# Altium PCB BOARD_4LAYER.PcbDoc (part 9 of 21)
Units mil, origin at the board's own origin, x right, y up, seen from the top; angles counter-clockwise.
Board outline 6692.91 x 10039.37 mil, 4 copper layers (Top Layer, Mid Layer 1, Mid Layer 2, Bottom Layer), stack 66.299 mil thick; 1532 components, 908 nets, 4105 pads, 1286 vias.
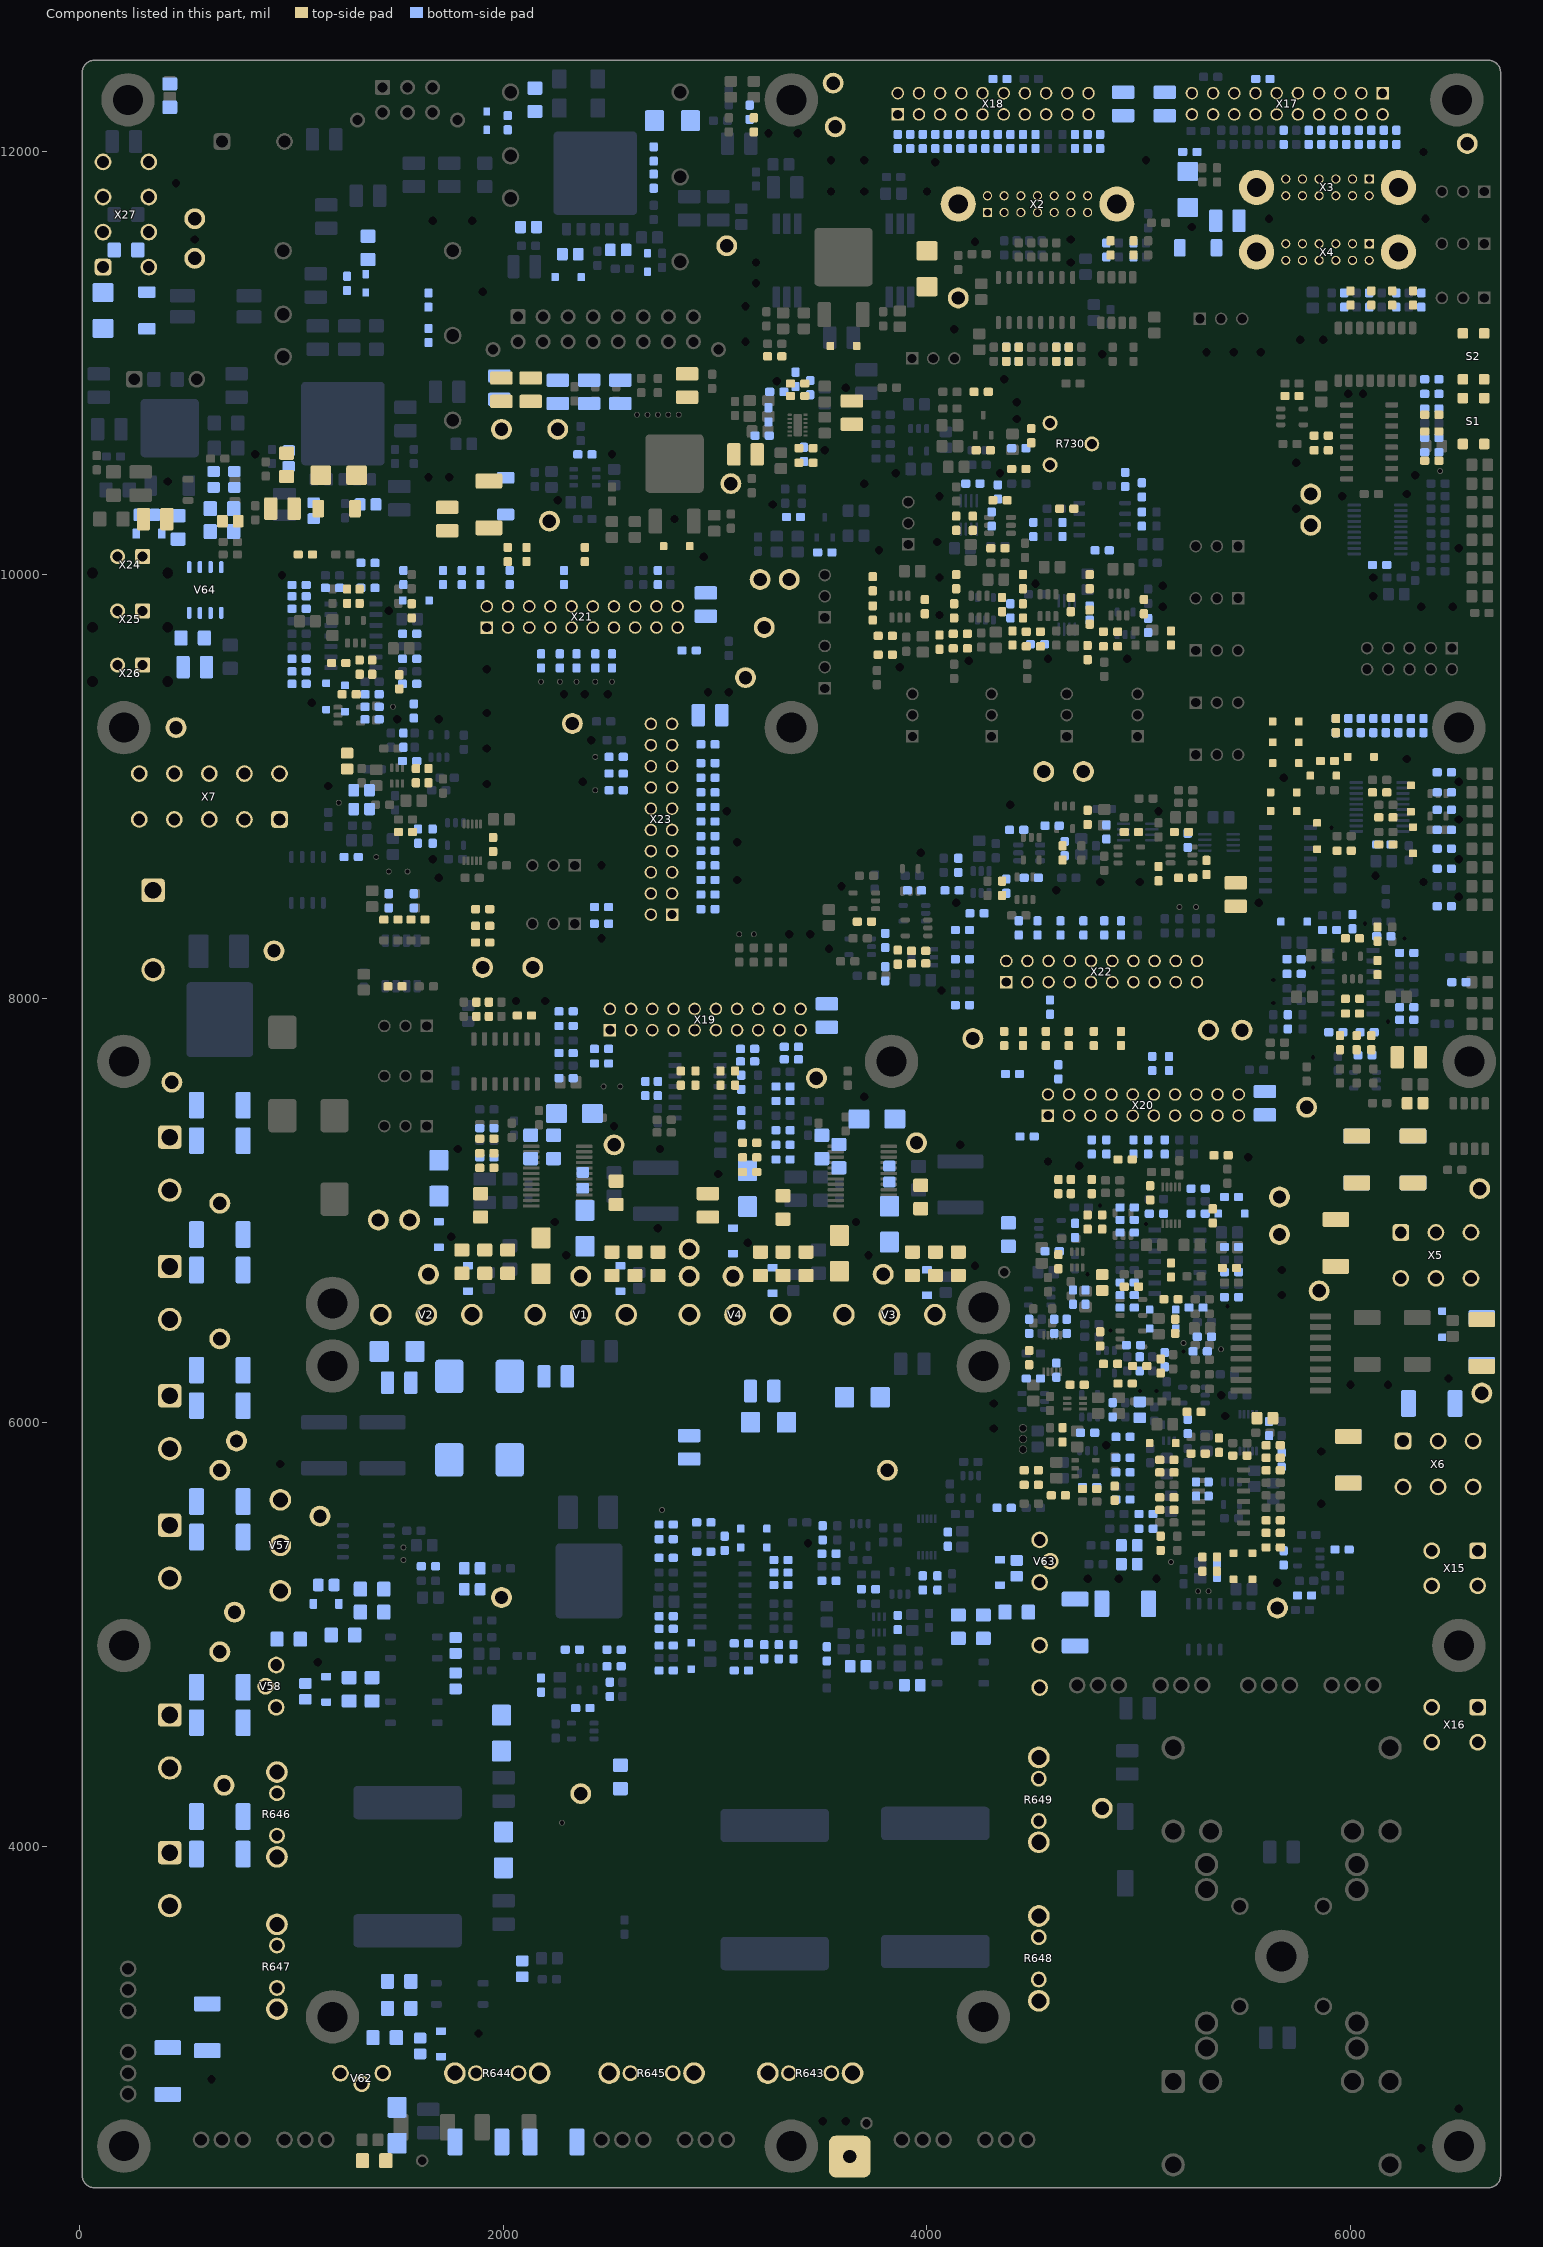
[diagram p11: the components of this part, seen from the top]

## Components (designator, comment, footprint, x,y, rotation, side; value= is the part's Value field where it differs from the comment) (continued)
R156 "ERJ-3EKF6200V" 0603-STANDART-1608 6440.94,8797.24 r0 bottom
R157 "ERJ-3EKF6200V" 0603-STANDART-1608 6440.94,8437.01 r0 bottom
R158 "ERJ-3EKF6200V" 0603-STANDART-1608 6440.94,8708.66 r0 bottom
R159 "ERJ-3EKF6200V" 0603-STANDART-1608 6440.94,8614.17 r0 bottom
R160 "ERJ-3EKF6200V" 0603-STANDART-1608 6440.94,8891.73 r0 bottom
R161 "ERJ-3EKF6200V" 0603-STANDART-1608 6440.94,8974.41 r0 bottom
R162 "ERJ-3EKF6200V" 0603-STANDART-1608 6440.94,9068.9 r0 bottom
R163 "ERJ-3EKF6200V" 0603-STANDART-1608 5988.19,9289.37 r90 bottom
R164 "ERJ-3EKF6200V" 0603-STANDART-1608 6165.35,9289.37 r270 bottom
R165 "ERJ-3EKF6200V" 0603-STANDART-1608 5929.13,9289.37 r90 bottom
R166 "ERJ-3EKF6200V" 0603-STANDART-1608 6047.24,9289.37 r90 bottom
R167 "ERJ-3EKF6200V" 0603-STANDART-1608 6283.46,9289.37 r90 bottom
R168 "ERJ-3EKF6200V" 0603-STANDART-1608 5929.13,9289.37 r90 top
R169 "ERJ-3EKF6200V" 0603-STANDART-1608 6106.3,9289.37 r270 bottom
R170 "ERJ-3EKF6200V" 0603-STANDART-1608 6224.41,9289.37 r270 bottom
R171 "ERJ-3EKF6200V" 0603-STANDART-1608 6342.52,9289.37 r270 bottom
R172 "ERJ-3EKF6200V" 0603-STANDART-1608 2966.54,9200.79 r0 bottom
R173 "ERJ-3EKF6200V" 0603-STANDART-1608 2966.54,9112.2 r0 bottom
R174 "ERJ-3EKF6200V" 0603-STANDART-1608 2533.46,9141.73 r180 bottom
R175 "ERJ-3EKF10R0V" 0603-STANDART-1608 1923.23,7389.76 r180 bottom
R176 "ERJ-3EKF10R0V" 0603-STANDART-1608 3320.87,7586.61 r180 bottom
R177 "ERJ-3EKF10R0V" 0603-STANDART-1608 1490.16,8059.06 r180 top
R178 "ERJ-3EKF10R0V" 0603-STANDART-1608 1647.64,9053.15 r270 top
R179 "ERJ-3EKF10R0V" 0603-STANDART-1608 1509.84,9496.06 r90 top
R180 "ERJ-3EKF10R0V" 0603-STANDART-1608 1066.93,10096.46 r0 top
R181 "ERJ-3EKF10R0V" 0603-STANDART-1608 1568.9,9830.71 r90 top
R182 "ERJ-3EKF10R0V" 0603-STANDART-1608 5259.84,6051.18 r0 top
R183 "ERJ-3EKF10R0V" 0603-STANDART-1608 4767.72,5696.85 r0 bottom
R184 "ERJ-3EKF10R0V" 0603-STANDART-1608 5033.46,5500 r180 bottom
R185 "ERJ-3EKF10R0V" 0603-STANDART-1608 5033.46,5568.9 r180 bottom
R186 "ERJ-3EKF10R0V" 0603-STANDART-1608 1539.37,8787.4 r180 top
R187 "ERJ-3EKF10R0V" 0603-STANDART-1608 5673.23,5824.8 r270 bottom
R188 "ERJ-3EKF10R0V" 0603-STANDART-1608 3517.72,10106.3 r0 bottom locked
R189 "ERJ-3EKF10R0V" 0603-STANDART-1608 3370.08,10273.62 r180 bottom locked
R190 "ERJ-3EKF10R0V" 0603-STANDART-1608 4777.56,7114.17 r270 top
R191 "ERJ-3EKF10R0V" 0603-STANDART-1608 5948.82,7793.31 r270 top
R192 "ERJ-3EKF10R0V" 0603-STANDART-1608 6096.46,7793.31 r270 top
R193 "ERJ-3EKF10R0V" 0603-STANDART-1608 6027.56,7793.31 r270 top
R194 "ERJ-3EKF10R0V" 0603-STANDART-1608 5151.57,6582.68 r0 top
R195 "ERJ-3EKF10R0V" 0603-STANDART-1608 5151.57,6720.47 r270 top
R196 "ERJ-3EKF10R0V" 0603-STANDART-1608 5427.17,6730.31 r0 top
R197 "ERJ-3EKF10R0V" 0603-STANDART-1608 5348.43,6976.38 r270 top
R198 "ERJ-3EKF10R0V" 0603-STANDART-1608 3724.41,5214.57 r0 bottom
R199 "ERJ-3EKF10R0V" 0603-STANDART-1608 2179.13,4761.81 r90 bottom
R200 "ERJ-3EKF10R0V" 0603-STANDART-1608 3527.56,4909.45 r270 bottom
R201 "ERJ-3EKF10R0V" 0603-STANDART-1608 2946.85,5529.53 r0 bottom
R202 "ERJ-3EKF10R0V" 0603-STANDART-1608 4364.17,5598.43 r180 bottom
R203 "ERJ-3EKF10R0V" 0603-STANDART-1608 4698.82,6907.48 r90 bottom
R204 "ERJ-3EKF10R0V" 0603-STANDART-1608 4935.04,6185.04 r180 top
R205 "ERJ-3EKF10R0V" 0603-STANDART-1608 4482.28,6454.72 r90 bottom
R206 "ERJ-3EKF10R0V" 0603-STANDART-1608 4492.13,5706.69 r0 top
R207 "ERJ-3EKF10R0V" 0603-STANDART-1608 4620.08,5657.48 r0 top
R208 "ERJ-3EKF10R0V" 0603-STANDART-1608 4265.75,10588.58 r180 top
R209 "ERJ-3EKF10R0V" 0603-STANDART-1608 4255.91,10864.17 r180 top
R210 "ERJ-3EKF10R0V" 0603-STANDART-1608 4433.07,10598.43 r0 bottom
R211 "ERJ-3EKF10R0V" 0603-STANDART-1608 4137.8,10244.09 r270 top
R212 "ERJ-3EKF10R0V" 0603-STANDART-1608 4866.14,9663.39 r0 top
R213 "ERJ-3EKF10R0V" 0603-STANDART-1608 4501.97,9663.39 r0 top
R214 "ERJ-3EKF10R0V" 0603-STANDART-1608 4157.48,9653.54 r0 top
R215 "ERJ-3EKF10R0V" 0603-STANDART-1608 3803.15,9624.02 r0 top
R216 "ERJ-3EKF10R0V" 0603-STANDART-1608 4334.65,10391.73 r270 bottom
R217 "ERJ-3EKF4701V" 0603-STANDART-1608 6135.83,10047.24 r180 bottom
R218 "ERJ-3EKF4701V" 0603-STANDART-1608 6332.68,11297.24 r90 bottom
R219 "ERJ-3EKF4701V" 0603-STANDART-1608 6214.57,11297.24 r90 bottom
R220 "ERJ-3EKF4701V" 0603-STANDART-1608 6086.61,11297.24 r90 bottom
R221 "ERJ-3EKF4701V" 0603-STANDART-1608 5968.5,11297.24 r90 bottom
R222 "ERJ-3EKF4701V" 0603-STANDART-1608 4974.41,11533.46 r90 bottom
R223 "ERJ-3EKF4701V" 0603-STANDART-1608 4846.46,11533.46 r90 bottom
R224 "ERJ-3EKF4701V" 0603-STANDART-1608 5860.24,10588.58 r0 top
R225 "ERJ-3EKF4701V" 0603-STANDART-1608 6381.89,10539.37 r180 top
R226 "ERJ-3EKF4701V" 0603-STANDART-1608 5860.24,10657.48 r0 top
R227 "ERJ-3EKF4701V" 0603-STANDART-1608 6381.89,10677.17 r180 top
R228 "ERJ-3EKF4701V" 0603-STANDART-1608 6381.89,10755.91 r180 top
R229 "ERJ-3EKF4701V" 0603-STANDART-1608 5722.44,10844.49 r180 top
R230 "ERJ-3EKF4701V" 0603-STANDART-1608 6381.89,10785.43 r180 bottom
R231 "ERJ-3EKF4701V" 0603-STANDART-1608 6381.89,10854.33 r180 bottom
R232 "ERJ-3EKF4701V" 0603-STANDART-1608 6381.89,10923.23 r180 bottom
R233 "ERJ-3EKF4701V" 0603-STANDART-1608 6381.89,10647.64 r180 bottom
R234 "ERJ-3EKF4701V" 0603-STANDART-1608 4610.24,11041.34 r90 top
R235 "ERJ-3EKF4701V" 0603-STANDART-1608 4433.07,11041.34 r90 top
R236 "ERJ-3EKF4701V" 0603-STANDART-1608 4374.02,11041.34 r90 top
R237 "ERJ-3EKF4701V" 0603-STANDART-1608 4669.29,11041.34 r90 top
R238 "ERJ-3EKF4701V" 0603-STANDART-1608 4433.07,11041.34 r90 bottom
R239 "ERJ-3EKF4701V" 0603-STANDART-1608 4610.24,11041.34 r90 bottom
R240 "ERJ-3EKF4701V" 0603-STANDART-1608 4669.29,11041.34 r90 bottom
R241 "ERJ-3EKF4701V" 0603-STANDART-1608 4374.02,11041.34 r90 bottom
R242 "ERJ-3EKF4701V" 0603-STANDART-1608 1923.23,7202.76 r180 top
R243 "ERJ-3EKF4701V" 0603-STANDART-1608 1923.23,7340.55 r180 top
R244 "ERJ-3EKF4701V" 0603-STANDART-1608 1923.23,7271.65 r180 top
R245 "ERJ-3EKF4701V" 0603-STANDART-1608 1874.02,7950.79 r90 top
R246 "ERJ-3EKF4701V" 0603-STANDART-1608 1933.07,7950.79 r90 top
R247 "ERJ-3EKF4701V" 0603-STANDART-1608 3320.87,7311.02 r180 bottom
R248 "ERJ-3EKF4701V" 0603-STANDART-1608 3320.87,7379.92 r180 bottom
R249 "ERJ-3EKF4701V" 0603-STANDART-1608 3320.87,7242.13 r180 bottom
R250 "ERJ-3EKF4701V" 0603-STANDART-1608 1470.47,8374.02 r0 top
R251 "ERJ-3EKF4701V" 0603-STANDART-1608 1598.43,8374.02 r180 top
R252 "ERJ-3EKF4701V" 0603-STANDART-1608 2671.26,7576.77 r90 bottom
R253 "ERJ-3EKF4701V" 0603-STANDART-1608 2730.32,7576.77 r90 bottom
R254 "ERJ-3EKF4701V" 0603-STANDART-1608 3124.02,7606.3 r270 bottom
R255 "ERJ-3EKF4701V" 0603-STANDART-1608 3124.02,7438.98 r270 bottom
R256 "ERJ-3EKF4701V" 0603-STANDART-1608 1588.58,9053.15 r270 top
R257 "ERJ-3EKF4701V" 0603-STANDART-1608 1598.43,8767.72 r270 bottom
R258 "ERJ-3EKF4701V" 0603-STANDART-1608 1667.32,8767.72 r270 bottom
R259 "ERJ-3EKF4701V" 0603-STANDART-1608 1952.76,8728.35 r270 top
R260 "ERJ-3EKF4701V" 0603-STANDART-1608 1273.62,9437.01 r0 top
R261 "ERJ-3EKF4701V" 0603-STANDART-1608 5230.31,5982.28 r90 bottom
R262 "ERJ-3EKF4701V" 0603-STANDART-1608 5269.69,5687.01 r270 bottom
R263 "ERJ-3EKF4701V" 0603-STANDART-1608 5328.74,5687.01 r270 bottom
R264 "ERJ-3EKF4701V" 0603-STANDART-1608 5614.17,5972.44 r90 bottom
R265 "ERJ-3EKF4701V" 0603-STANDART-1608 4875.98,6061.02 r90 bottom
R266 "ERJ-3EKF4701V" 0603-STANDART-1608 2385.83,10568.9 r180 bottom
R267 "ERJ-3EKF4701V" 0603-STANDART-1608 3163.39,12183.07 r270 bottom
R268 "ERJ-3EKF4701V" 0603-STANDART-1608 3281.5,11031.5 r180 top locked
R269 "ERJ-3EKF4701V" 0603-STANDART-1608 4620.08,6759.84 r90 top
R270 "ERJ-3EKF4701V" 0603-STANDART-1608 4757.87,6946.85 r90 top
R271 "ERJ-3EKF4701V" 0603-STANDART-1608 4826.77,6946.85 r90 top
R272 "ERJ-3EKF4701V" 0603-STANDART-1608 5053.15,7084.65 r90 top
R273 "ERJ-3EKF4701V" 0603-STANDART-1608 6066.93,7734.25 r180 bottom
R274 "ERJ-3EKF4701V" 0603-STANDART-1608 4964.57,6641.73 r0 top
R275 "ERJ-3EKF4701V" 0603-STANDART-1608 3862.2,5057.09 r90 bottom
R276 "ERJ-3EKF4701V" 0603-STANDART-1608 4049.21,5244.09 r90 bottom
R277 "ERJ-3EKF4701V" 0603-STANDART-1608 3980.32,5244.09 r90 bottom
R278 "ERJ-3EKF4701V" 0603-STANDART-1608 4098.43,5450.79 r90 bottom
R279 "ERJ-3EKF4701V" 0603-STANDART-1608 2375.98,4653.54 r180 bottom
R280 "ERJ-3EKF4701V" 0603-STANDART-1608 4708.66,6179.13 r0 top
R281 "ERJ-3EKF4701V" 0603-STANDART-1608 4610.24,6248.03 r90 bottom
R282 "ERJ-3EKF4701V" 0603-STANDART-1608 4501.97,6208.66 r180 bottom
R283 "ERJ-3EKF4701V" 0603-STANDART-1608 4482.28,6307.09 r270 top
R284 "ERJ-3EKF4701V" 0603-STANDART-1608 4590.55,6809.06 r0 bottom
R285 "ERJ-3EKF4701V" 0603-STANDART-1608 6155.51,8728.35 r180 bottom
R286 "ERJ-3EKF4701V" 0603-STANDART-1608 5968.5,8698.82 r180 top
R287 "ERJ-3EKF4701V" 0603-STANDART-1608 6165.35,8856.3 r0 top
R288 "ERJ-3EKF4701V" 0603-STANDART-1608 6135.83,8974.41 r0 top
R289 "ERJ-3EKF4701V" 0603-STANDART-1608 6165.35,8728.35 r0 top
R290 "ERJ-3EKF4701V" 0603-STANDART-1608 5889.76,9122.05 r180 top
R291 "ERJ-3EKF4701V" 0603-STANDART-1608 5200.79,8787.4 r180 top
R292 "ERJ-3EKF4701V" 0603-STANDART-1608 4639.76,8688.98 r90 top
R293 "ERJ-3EKF4701V" 0603-STANDART-1608 5230.31,8748.03 r90 bottom
R294 "ERJ-3EKF4701V" 0603-STANDART-1608 4492.13,8570.87 r180 bottom
R295 "ERJ-3EKF4701V" 0603-STANDART-1608 4846.46,8787.4 r90 bottom
R296 "ERJ-3EKF4701V" 0603-STANDART-1608 3862.2,8196.85 r90 top
R297 "ERJ-3EKF4701V" 0603-STANDART-1608 3960.63,8226.38 r0 top
R298 "ERJ-3EKF4701V" 0603-STANDART-1608 4374.02,8531.5 r270 bottom
R299 "ERJ-3EKF4701V" 0603-STANDART-1608 4757.87,8856.3 r270 top
R300 "ERJ-3EKF4701V" 0603-STANDART-1608 4354.33,8521.65 r270 top
R301 "ERJ-3EKF4701V" 0603-STANDART-1608 3940.94,8511.81 r0 bottom
R302 "ERJ-3EKF4701V" 0603-STANDART-1608 3803.15,8118.11 r90 bottom
R303 "ERJ-3EKF4701V" 0603-STANDART-1608 3704.72,8364.17 r0 top
R304 "ERJ-3EKF4701V" 0603-STANDART-1608 3960.63,8167.32 r0 top
R305 "ERJ-3EKF4701V" 0603-STANDART-1608 4964.57,8787.4 r180 top
R306 "ERJ-3EKF4701V" 0603-STANDART-1608 4334.65,10125.98 r180 top
R307 "ERJ-3EKF4701V" 0603-STANDART-1608 5151.57,9702.76 r270 top
R308 "ERJ-3EKF4701V" 0603-STANDART-1608 4757.87,9633.86 r270 top
R309 "ERJ-3EKF4701V" 0603-STANDART-1608 4403.54,9702.76 r270 top
R310 "ERJ-3EKF4701V" 0603-STANDART-1608 4059.06,9683.07 r270 top
R311 "ERJ-6ENF2401V" 0805-STANDART-2012 1263.78,9122.05 r270 top
R312 "ERJ-6ENF2401V" 0805-STANDART-2012 5003.94,6061.02 r270 bottom
R313 "ERJ-6ENF2401V" 0805-STANDART-2012 4826.77,6661.42 r90 top
R314 "ERJ-6ENF2401V" 0805-STANDART-2012 3675.2,4850.39 r0 bottom
R315 "ERJ-3EKF1022V" 0603-STANDART-1608 1381.89,9318.9 r0 bottom
R316 "ERJ-3EKF1022V" 0603-STANDART-1608 1037.4,9486.22 r180 bottom
R317 "ERJ-3EKF1022V" 0603-STANDART-1608 1037.4,9604.33 r0 bottom
R318 "ERJ-3EKF1022V" 0603-STANDART-1608 1037.4,9545.28 r0 bottom
R319 "ERJ-3EKF1022V" 0603-STANDART-1608 1037.4,9899.61 r180 bottom
R320 "ERJ-3EKF1022V" 0603-STANDART-1608 1362.2,10057.09 r180 bottom
R321 "ERJ-3EKF1022V" 0603-STANDART-1608 1559.06,9722.44 r180 bottom
R322 "ERJ-3EKF1022V" 0603-STANDART-1608 1529.53,9988.19 r90 bottom
R323 "ERJ-3EKF1022V" 0603-STANDART-1608 1322.83,9899.61 r270 top
R324 "ERJ-3EKF1022V" 0603-STANDART-1608 1381.89,9564.96 r90 top
R325 "ERJ-3EKF1022V" 0603-STANDART-1608 1381.89,9437.01 r180 bottom
R326 "ERJ-3EKF1022V" 0603-STANDART-1608 1322.83,9564.96 r90 top
R327 "ERJ-3EKF1022V" 0603-STANDART-1608 1381.89,9377.95 r0 bottom
R328 "ERJ-3EKF1022V" 0603-STANDART-1608 5368.11,5332.68 r270 top
R329 "ERJ-3EKF1022V" 0603-STANDART-1608 5633.86,5539.37 r0 top
R330 "ERJ-3EKF1022V" 0603-STANDART-1608 5633.86,5480.31 r180 top
R331 "ERJ-3EKF1022V" 0603-STANDART-1608 5633.86,5411.42 r180 top
R332 "ERJ-3EKF1022V" 0603-STANDART-1608 5633.86,5893.7 r0 top
R333 "ERJ-3EKF1022V" 0603-STANDART-1608 5377.95,5893.7 r270 top
R334 "ERJ-3EKF1022V" 0603-STANDART-1608 5131.89,5765.75 r0 top
R335 "ERJ-3EKF1022V" 0603-STANDART-1608 5131.89,5824.8 r180 top
R336 "ERJ-3EKF1022V" 0603-STANDART-1608 4925.2,5765.75 r180 bottom
R337 "ERJ-3EKF1022V" 0603-STANDART-1608 4925.2,5834.65 r180 bottom
R338 "ERJ-3EKF1022V" 0603-STANDART-1608 5102.36,5431.1 r90 top
R339 "ERJ-3EKF1022V" 0603-STANDART-1608 4925.2,5933.07 r180 bottom
R340 "ERJ-3EKF1022V" 0603-STANDART-1608 5299.21,5332.68 r270 top
R341 "ERJ-3EKF1022V" 0603-STANDART-1608 6263.78,7960.63 r0 bottom
R342 "ERJ-3EKF1022V" 0603-STANDART-1608 6263.78,7901.57 r180 bottom
R343 "ERJ-3EKF1022V" 0603-STANDART-1608 6076.77,7842.52 r0 bottom
R344 "ERJ-3EKF1022V" 0603-STANDART-1608 6007.87,8364.17 r270 bottom
R345 "ERJ-3EKF1022V" 0603-STANDART-1608 5702.76,7891.73 r90 bottom
R346 "ERJ-3EKF1022V" 0603-STANDART-1608 5732.28,8187.01 r0 bottom
R347 "ERJ-3EKF1022V" 0603-STANDART-1608 5732.28,8118.11 r180 bottom
R348 "ERJ-3EKF1022V" 0603-STANDART-1608 6007.87,8285.43 r0 top
R349 "ERJ-3EKF1022V" 0603-STANDART-1608 6007.87,7931.1 r0 top
R350 "ERJ-3EKF1022V" 0603-STANDART-1608 5309.06,6405.51 r0 bottom
R351 "ERJ-3EKF1022V" 0603-STANDART-1608 4944.88,6661.42 r180 bottom
R352 "ERJ-3EKF1022V" 0603-STANDART-1608 4944.88,6543.31 r0 bottom
R353 "ERJ-3EKF1022V" 0603-STANDART-1608 4944.88,6602.36 r0 bottom
R354 "ERJ-3EKF1022V" 0603-STANDART-1608 4944.88,6956.69 r180 bottom
R355 "ERJ-3EKF1022V" 0603-STANDART-1608 5279.53,7104.33 r180 bottom
R356 "ERJ-3EKF1022V" 0603-STANDART-1608 5437.01,6828.74 r180 bottom
R357 "ERJ-3EKF1022V" 0603-STANDART-1608 5437.01,7064.96 r0 bottom
R358 "ERJ-3EKF1022V" 0603-STANDART-1608 5171.26,6454.72 r270 top
R359 "ERJ-3EKF1022V" 0603-STANDART-1608 4866.14,6277.56 r0 top
R360 "ERJ-3EKF1022V" 0603-STANDART-1608 5269.69,6543.31 r180 bottom
R361 "ERJ-3EKF1022V" 0603-STANDART-1608 5003.94,6267.72 r180 top
R362 "ERJ-3EKF1022V" 0603-STANDART-1608 5289.37,6336.61 r180 bottom
R363 "ERJ-3EKF1022V" 0603-STANDART-1608 2769.68,5450.79 r180 bottom
R364 "ERJ-3EKF1022V" 0603-STANDART-1608 3311.02,5234.25 r0 bottom
R365 "ERJ-3EKF1022V" 0603-STANDART-1608 3311.02,5352.36 r180 bottom
R366 "ERJ-3EKF1022V" 0603-STANDART-1608 3311.02,5293.31 r180 bottom
R367 "ERJ-3EKF1022V" 0603-STANDART-1608 3232.28,4919.29 r270 bottom
R368 "ERJ-3EKF1022V" 0603-STANDART-1608 2769.68,5027.56 r0 bottom
R369 "ERJ-3EKF1022V" 0603-STANDART-1608 2769.68,5086.61 r0 bottom
R370 "ERJ-3EKF1022V" 0603-STANDART-1608 3124.02,4830.71 r0 bottom
R371 "ERJ-3EKF1022V" 0603-STANDART-1608 2769.68,4830.71 r180 bottom
R372 "ERJ-3EKF1022V" 0603-STANDART-1608 2523.62,4929.13 r180 bottom
R373 "ERJ-3EKF1022V" 0603-STANDART-1608 2946.85,5391.73 r180 bottom
R374 "ERJ-3EKF1022V" 0603-STANDART-1608 2523.62,4850.39 r180 bottom
R375 "ERJ-3EKF1022V" 0603-STANDART-1608 2769.68,5519.69 r180 bottom
R376 "ERJ-3EKF1022V" 0603-STANDART-1608 4659.45,6454.72 r90 bottom
R377 "ERJ-3EKF1022V" 0603-STANDART-1608 4767.72,5687.01 r180 top
R378 "ERJ-3EKF1022V" 0603-STANDART-1608 4885.83,5667.32 r270 top
R379 "ERJ-3EKF1022V" 0603-STANDART-1608 3222.44,10657.48 r180 bottom
R380 "ERJ-3EKF1022V" 0603-STANDART-1608 3379.92,10923.23 r90 bottom
R381 "ERJ-3EKF1022V" 0603-STANDART-1608 3251.97,10755.91 r270 bottom
R382 "ERJ-3EKF1022V" 0603-STANDART-1608 4492.13,10657.48 r270 top
R383 "ERJ-3EKF1022V" 0603-STANDART-1608 4433.07,10500 r0 top
R384 "ERJ-3EKF1022V" 0603-STANDART-1608 5013.78,10401.57 r270 bottom
R385 "ERJ-3EKF1022V" 0603-STANDART-1608 5013.78,10263.78 r270 bottom
R386 "ERJ-3EKF1022V" 0603-STANDART-1608 4935.04,10450.79 r270 bottom
R387 "ERJ-3EKF2052V" 0603-STANDART-1608 1529.53,9220.47 r90 bottom
R388 "ERJ-3EKF2052V" 0603-STANDART-1608 1037.4,9840.55 r180 bottom
R389 "ERJ-3EKF2052V" 0603-STANDART-1608 1194.88,9938.98 r0 bottom
R390 "ERJ-3EKF2052V" 0603-STANDART-1608 1559.06,9604.33 r180 bottom
R391 "ERJ-3EKF2052V" 0603-STANDART-1608 1559.06,9486.22 r180 bottom
R392 "ERJ-3EKF2052V" 0603-STANDART-1608 5781.5,5185.04 r180 bottom
R393 "ERJ-3EKF2052V" 0603-STANDART-1608 5633.86,5775.59 r0 top
R394 "ERJ-3EKF2052V" 0603-STANDART-1608 5476.38,5844.49 r180 top
R395 "ERJ-3EKF2052V" 0603-STANDART-1608 5131.89,5588.58 r0 top
R396 "ERJ-3EKF2052V" 0603-STANDART-1608 5131.89,5647.64 r0 top
R397 "ERJ-3EKF2052V" 0603-STANDART-1608 6155.51,8295.28 r0 bottom
R398 "ERJ-3EKF2052V" 0603-STANDART-1608 6263.78,8216.54 r0 bottom
R399 "ERJ-3EKF2052V" 0603-STANDART-1608 5003.94,6277.56 r270 bottom
R400 "ERJ-3EKF2052V" 0603-STANDART-1608 4944.88,6897.64 r180 bottom
R401 "ERJ-3EKF2052V" 0603-STANDART-1608 5082.68,6986.22 r0 bottom
R402 "ERJ-3EKF2052V" 0603-STANDART-1608 5437.01,6710.63 r180 bottom
R403 "ERJ-3EKF2052V" 0603-STANDART-1608 5437.01,6592.52 r180 bottom
R404 "ERJ-3EKF2052V" 0603-STANDART-1608 3537.4,5381.89 r0 bottom
R405 "ERJ-3EKF2052V" 0603-STANDART-1608 3301.18,4919.29 r270 bottom
R406 "ERJ-3EKF2052V" 0603-STANDART-1608 3124.02,4958.66 r180 bottom
R407 "ERJ-3EKF2052V" 0603-STANDART-1608 2769.68,5362.2 r0 bottom
R408 "ERJ-3EKF2052V" 0603-STANDART-1608 3045.28,5431.1 r270 bottom
R409 "ERJ-3EKF2052V" 0603-STANDART-1608 4492.13,5775.59 r0 top
R410 "ERJ-8GEYJ2R2V" 1206-STANDART-3216 2622.05,6750 r90 top
R411 "ERJ-8GEYJ2R2V" 1206-STANDART-3216 1913.39,6759.84 r90 top
R412 "ERJ-8GEYJ2R2V" 1206-STANDART-3216 4039.37,6750 r90 top
R413 "ERJ-8GEYJ2R2V" 1206-STANDART-3216 3320.87,6750 r90 top
R414 "ERJ-8GEYJ330V" 1206-STANDART-3216 2730.32,6750 r90 top
R415 "ERJ-8GEYJ330V" 1206-STANDART-3216 2021.65,6759.84 r90 top
R416 "ERJ-8GEYJ330V" 1206-STANDART-3216 4147.64,6750 r90 top
R417 "ERJ-8GEYJ330V" 1206-STANDART-3216 3429.13,6750 r90 top
R418 "ERJ-8GEYJ203V" 1206-STANDART-3216 220.47,11533.46 r180 bottom
R419 "ERJ-8GEYJ203V" 1206-STANDART-3216 535.43,9702.76 r180 bottom
R420 "ERJ-8GEYJ203V" 1206-STANDART-3216 1381.89,4742.13 r270 bottom
R421 "ERJ-8GEYJ203V" 1206-STANDART-3216 1273.62,4742.13 r270 bottom
R422 "ERJ-8GEYJ203V" 1206-STANDART-3216 1509.84,3236.22 r0 bottom
R423 "ERJ-8GEYJ203V" 1206-STANDART-3216 1509.84,3364.17 r0 bottom
R424 "ERJ-8GEYJ203V" 1206-STANDART-3216 4147.64,5037.4 r270 bottom
R425 "ERJ-8GEYJ203V" 1206-STANDART-3216 4265.75,5037.4 r270 bottom
R426 "ERJ-8GEYJ203V" 1206-STANDART-3216 1381.89,5214.57 r0 bottom
R427 "ERJ-8GEYJ203V" 1206-STANDART-3216 1381.89,5106.3 r0 bottom
R428 "ERJ-3EKF2000V" 0603-STANDART-1608 5683.07,12064.96 r90 bottom
R429 "ERJ-3EKF2000V" 0603-STANDART-1608 5801.18,12064.96 r90 bottom
R430 "ERJ-3EKF2000V" 0603-STANDART-1608 6155.51,12064.96 r90 bottom
R431 "ERJ-3EKF2000V" 0603-STANDART-1608 6037.4,12064.96 r90 bottom
R432 "ERJ-3EKF2000V" 0603-STANDART-1608 5978.35,12064.96 r90 bottom
R433 "ERJ-3EKF2000V" 0603-STANDART-1608 5860.24,12064.96 r90 bottom
R434 "ERJ-3EKF2000V" 0603-STANDART-1608 6096.46,12064.96 r90 bottom
R435 "ERJ-3EKF2000V" 0603-STANDART-1608 6214.57,12064.96 r90 bottom
R436 "ERJ-3EKF2000V" 0603-STANDART-1608 5919.29,12064.96 r90 bottom
R437 "ERJ-3EKF2000V" 0603-STANDART-1608 5584.65,12340.55 r180 bottom
R438 "ERJ-3EKF2000V" 0603-STANDART-1608 4452.76,12045.28 r90 bottom
R439 "ERJ-3EKF2000V" 0603-STANDART-1608 4216.54,12045.28 r90 bottom
R440 "ERJ-3EKF2000V" 0603-STANDART-1608 4393.7,12045.28 r90 bottom
R441 "ERJ-3EKF2000V" 0603-STANDART-1608 4098.43,12045.28 r90 bottom
R442 "ERJ-3EKF2000V" 0603-STANDART-1608 4511.81,12045.28 r90 bottom
R443 "ERJ-3EKF2000V" 0603-STANDART-1608 4275.59,12045.28 r90 bottom
R444 "ERJ-3EKF2000V" 0603-STANDART-1608 4334.65,12045.28 r90 bottom
R445 "ERJ-3EKF2000V" 0603-STANDART-1608 4157.48,12045.28 r90 bottom
R446 "ERJ-3EKF2000V" 0603-STANDART-1608 4039.37,12045.28 r90 bottom
R447 "ERJ-3EKF2000V" 0603-STANDART-1608 4344.49,12340.55 r0 bottom
R448 "ERJ-3EKF2000V" 0603-STANDART-1608 3980.32,12045.28 r90 bottom
R449 "ERJ-3EKF2000V" 0603-STANDART-1608 3862.2,12045.28 r90 bottom
R450 "ERJ-3EKF2000V" 0603-STANDART-1608 3921.26,12045.28 r90 bottom
R451 "ERJ-3EKF2000V" 0603-STANDART-1608 2297.24,7940.94 r0 bottom
R452 "ERJ-3EKF2000V" 0603-STANDART-1608 2100.39,7921.26 r0 top
R453 "ERJ-3EKF2000V" 0603-STANDART-1608 2838.58,7625.98 r90 top
R454 "ERJ-3EKF2000V" 0603-STANDART-1608 3153.54,7763.78 r180 bottom
R455 "ERJ-3EKF2000V" 0603-STANDART-1608 3360.24,7714.57 r180 bottom
R456 "ERJ-3EKF2000V" 0603-STANDART-1608 2464.57,7763.78 r0 bottom
R457 "ERJ-3EKF2000V" 0603-STANDART-1608 2907.48,7625.98 r90 top
R458 "ERJ-3EKF2000V" 0603-STANDART-1608 3025.59,7625.98 r90 top
R459 "ERJ-3EKF2000V" 0603-STANDART-1608 3153.54,7704.72 r180 bottom
R460 "ERJ-3EKF2000V" 0603-STANDART-1608 3094.49,7625.98 r90 top
R461 "ERJ-3EKF2000V" 0603-STANDART-1608 3360.24,7773.62 r180 bottom
R462 "ERJ-3EKF2000V" 0603-STANDART-1608 2297.24,7872.05 r0 bottom
R463 "ERJ-3EKF2000V" 0603-STANDART-1608 2464.57,7694.88 r0 bottom
R464 "ERJ-3EKF2000V" 0603-STANDART-1608 1559.06,9122.05 r0 bottom
R465 "ERJ-3EKF2000V" 0603-STANDART-1608 5958.66,5401.57 r180 bottom
R466 "ERJ-3EKF2000V" 0603-STANDART-1608 2021.65,10096.46 r270 top
R467 "ERJ-3EKF2000V" 0603-STANDART-1608 1893.7,9988.19 r270 bottom
R468 "ERJ-3EKF2000V" 0603-STANDART-1608 1805.12,9988.19 r270 bottom
R469 "ERJ-3EKF2000V" 0603-STANDART-1608 4679.13,7114.17 r90 top
R470 "ERJ-3EKF2000V" 0603-STANDART-1608 4846.46,7301.18 r90 bottom
R471 "ERJ-3EKF2000V" 0603-STANDART-1608 1716.54,9988.19 r270 bottom
R472 "ERJ-3EKF2000V" 0603-STANDART-1608 2110.24,10096.46 r270 top
R473 "ERJ-3EKF2000V" 0603-STANDART-1608 2031.5,9988.19 r270 bottom
R474 "ERJ-3EKF2000V" 0603-STANDART-1608 4620.08,7655.51 r270 bottom
R475 "ERJ-3EKF2000V" 0603-STANDART-1608 5387.8,7261.81 r180 top
R476 "ERJ-3EKF2000V" 0603-STANDART-1608 5062.99,7694.88 r270 bottom
R477 "ERJ-3EKF2000V" 0603-STANDART-1608 5043.31,7301.18 r90 bottom
R478 "ERJ-3EKF2000V" 0603-STANDART-1608 4403.54,7645.67 r0 bottom
R479 "ERJ-3EKF2000V" 0603-STANDART-1608 4620.08,7114.17 r90 top
R480 "ERJ-3EKF2000V" 0603-STANDART-1608 4777.56,7301.18 r90 bottom
R481 "ERJ-3EKF2000V" 0603-STANDART-1608 4935.04,7242.13 r180 top
R482 "ERJ-3EKF2000V" 0603-STANDART-1608 4974.41,7301.18 r90 bottom
R483 "ERJ-3EKF2000V" 0603-STANDART-1608 5141.73,7694.88 r270 bottom
R484 "ERJ-3EKF2000V" 0603-STANDART-1608 2287.4,9988.19 r270 bottom
R485 "ERJ-3EKF2000V" 0603-STANDART-1608 2877.95,9643.7 r180 bottom
R486 "ERJ-3EKF2000V" 0603-STANDART-1608 2513.78,9594.49 r90 bottom
R487 "ERJ-3EKF2000V" 0603-STANDART-1608 2346.46,9594.49 r90 bottom
R488 "ERJ-3EKF2000V" 0603-STANDART-1608 2179.13,9594.49 r90 bottom
R489 "ERJ-3EKF2000V" 0603-STANDART-1608 2267.72,9594.49 r90 bottom
R490 "ERJ-3EKF2000V" 0603-STANDART-1608 2435.04,9594.49 r90 bottom
R491 "ERJ-3EKF2000V" 0603-STANDART-1608 5929.13,7842.52 r0 bottom
R492 "ERJ-3EKF2000V" 0603-STANDART-1608 4974.41,6366.14 r180 bottom
R493 "ERJ-3EKF2000V" 0603-STANDART-1608 3507.87,5480.31 r90 bottom
R494 "ERJ-3EKF2000V" 0603-STANDART-1608 4669.29,7812.99 r90 top
R495 "ERJ-3EKF2000V" 0603-STANDART-1608 4561.02,7812.99 r90 top
R496 "ERJ-3EKF2000V" 0603-STANDART-1608 4433.07,8334.65 r270 bottom
R497 "ERJ-3EKF2000V" 0603-STANDART-1608 4521.65,8334.65 r270 bottom
R498 "ERJ-3EKF2000V" 0603-STANDART-1608 4738.19,8334.65 r270 bottom
R499 "ERJ-3EKF2000V" 0603-STANDART-1608 4452.76,7812.99 r90 top
R500 "ERJ-3EKF2000V" 0603-STANDART-1608 4580.71,7960.63 r90 bottom
R501 "ERJ-3EKF2000V" 0603-STANDART-1608 4915.35,8334.65 r270 bottom
R502 "ERJ-3EKF2000V" 0603-STANDART-1608 4629.92,8334.65 r270 bottom
R503 "ERJ-3EKF2000V" 0603-STANDART-1608 4915.35,7812.99 r90 top
R504 "ERJ-3EKF2000V" 0603-STANDART-1608 4836.61,8334.65 r270 bottom
R505 "ERJ-3EKF2000V" 0603-STANDART-1608 4364.17,7812.99 r90 top
R506 "ERJ-3EKF2000V" 0603-STANDART-1608 4787.4,7812.99 r90 top
R507 "ERJ-3EKF2000V" 0603-STANDART-1608 2966.54,8492.13 r180 bottom
R508 "ERJ-3EKF2000V" 0603-STANDART-1608 2966.54,9043.31 r180 bottom
R509 "ERJ-3EKF2000V" 0603-STANDART-1608 2464.57,8354.33 r0 bottom
R510 "ERJ-3EKF2000V" 0603-STANDART-1608 2533.46,9062.99 r0 bottom
R511 "ERJ-3EKF2000V" 0603-STANDART-1608 2966.54,8698.82 r180 bottom
R512 "ERJ-3EKF2000V" 0603-STANDART-1608 2966.54,8561.02 r180 bottom
R513 "ERJ-3EKF2000V" 0603-STANDART-1608 2464.57,8433.07 r0 bottom
R514 "ERJ-3EKF2000V" 0603-STANDART-1608 2966.54,8423.23 r180 bottom
R515 "ERJ-3EKF2000V" 0603-STANDART-1608 2966.54,8629.92 r180 bottom
R516 "ERJ-3EKF2000V" 0603-STANDART-1608 2966.54,8905.51 r180 bottom
R517 "ERJ-3EKF2000V" 0603-STANDART-1608 2966.54,8836.61 r180 bottom
R518 "ERJ-3EKF2000V" 0603-STANDART-1608 2966.54,8767.72 r180 bottom
R519 "ERJ-3EKF10R7V" 0603-STANDART-1608 6381.89,10578.74 r180 bottom
R520 "ERJ-3EKF10R7V" 0603-STANDART-1608 1263.78,9899.61 r270 top
R521 "ERJ-3EKF10R7V" 0603-STANDART-1608 1037.4,9952.76 r180 bottom
R522 "ERJ-3EKF10R7V" 0603-STANDART-1608 1283.46,8669.29 r0 bottom
R523 "ERJ-3EKF10R7V" 0603-STANDART-1608 4925.2,5637.8 r180 bottom
R524 "ERJ-3EKF10R7V" 0603-STANDART-1608 5633.86,5834.65 r0 top
R525 "ERJ-3EKF10R7V" 0603-STANDART-1608 5368.11,5303.15 r270 bottom
R526 "ERJ-3EKF10R7V" 0603-STANDART-1608 2021.65,12133.86 r90 bottom
R527 "ERJ-3EKF10R7V" 0603-STANDART-1608 2710.63,11986.22 r90 bottom
R528 "ERJ-3EKF10R7V" 0603-STANDART-1608 1263.78,11375.98 r90 bottom
R529 "ERJ-3EKF10R7V" 0603-STANDART-1608 1647.64,11129.92 r270 bottom
R530 "ERJ-3EKF10R7V" 0603-STANDART-1608 6125.98,8305.12 r90 top
R531 "ERJ-3EKF10R7V" 0603-STANDART-1608 5102.36,6267.72 r90 top
R532 "ERJ-3EKF10R7V" 0603-STANDART-1608 4944.88,7015.75 r180 bottom
R533 "ERJ-3EKF10R7V" 0603-STANDART-1608 2503.94,4742.13 r270 bottom
R534 "ERJ-3EKF10R7V" 0603-STANDART-1608 3370.08,4919.29 r270 bottom
R535 "ERJ-3EKF10R7V" 0603-STANDART-1608 1647.64,5322.83 r180 bottom
R536 "ERJ-3EKF10R7V" 0603-STANDART-1608 4600.39,6454.72 r90 bottom
R537 "ERJ-3EKF10R7V" 0603-STANDART-1608 3291.34,10864.17 r0 bottom
R538 "ERJ-3EKF10R7V" 0603-STANDART-1608 3448.82,10883.86 r270 bottom
R539 "ERJ-3EKF10R7V" 0603-STANDART-1608 3419.29,10568.9 r90 bottom
R540 "ERJ-3EKF10R7V" 0603-STANDART-1608 4521.65,9673.23 r180 bottom
R541 "ERJ-3EKF10R7V" 0603-STANDART-1608 4216.54,10431.1 r0 bottom
R542 "MCR25JZHJ000" 1210-STANDART-3225 5122.05,12222.44 r270 bottom
R543 "MCR25JZHJ000" 1210-STANDART-3225 4925.2,12222.44 r270 bottom
R544 "MCR25JZHJ000" 1210-STANDART-3225 2966.54,7025.59 r270 top
R545 "MCR25JZHJ000" 1210-STANDART-3225 3527.56,7921.26 r90 bottom
R546 "MCR25JZHJ000" 1210-STANDART-3225 5417.32,11671.26 r180 bottom
R547 "MCR25JZHJ000" 1210-STANDART-3225 5594.49,7507.87 r90 bottom
R548 "MCR25JZHJ000" 1210-STANDART-3225 958.66,10312.99 r0 top
R549 "MCR25JZHJ000" 1210-STANDART-3225 2868.11,10893.7 r270 top
R550 "MCR25JZHJ000" 1210-STANDART-3225 2257.87,10864.17 r270 bottom
R551 "MCR25JZHJ000" 1210-STANDART-3225 2553.15,10864.17 r270 bottom
R552 "MCR25JZHJ000" 1210-STANDART-3225 2405.51,10864.17 r270 bottom
R553 "MCR25JZHJ000" 1210-STANDART-3225 1982.28,10883.86 r270 bottom
R554 "MCR25JZHJ000" 1210-STANDART-3225 1992.13,10874.02 r270 top
R555 "MCR25JZHJ000" 1210-STANDART-3225 2129.92,10874.02 r270 top
R556 "MCR25JZHJ000" 1210-STANDART-3225 2956.69,9860.24 r90 bottom
R557 "MCR25JZHJ000" 1210-STANDART-3225 5456.69,8492.13 r90 top
R558 "MCR25JZHJ000" 1210-STANDART-3225 3645.67,10765.75 r90 top
R559 "MCR25JZHJ000" 1210-STANDART-3225 3143.7,10568.9 r0 top
R560 "MCR25JZHJ000" 1210-STANDART-3225 2976.38,9338.58 r0 bottom
R561 "ERJ-3EKF3401V" 0603-STANDART-1608 2710.63,11858.27 r90 bottom
R562 "ERJ-3EKF3401V" 0603-STANDART-1608 1647.64,11297.24 r270 bottom
R563 "ERJ-6RQJ4R7V" 0805-STANDART-2012 1332.68,8895.67 r0 bottom
R564 "ERJ-6RQJ4R7V" 0805-STANDART-2012 4954.72,5332.68 r180 bottom
R565 "ERJ-6RQJ4R7V" 0805-STANDART-2012 5594.49,6021.65 r180 top
R566 "ERJ-6RQJ4R7V" 0805-STANDART-2012 6303.15,7507.87 r180 top
R567 "ERJ-6RQJ4R7V" 0805-STANDART-2012 1854.33,5214.57 r0 bottom
R568 "ERJ-8GEYJ182V" 1206-STANDART-3216 978.35,10519.68 r270 top
R569 "ERJ-6GEYJ472V" 0805-STANDART-2012 1362.2,10332.68 r180 bottom
R570 "ERJ-6GEYJ472V" 0805-STANDART-2012 2543.31,11533.46 r180 bottom
R571 "ERJ-6ENF28R7V" 0805-STANDART-2012 1106.3,10303.15 r270 bottom
R572 "ERJ-6ENF2671V" 0805-STANDART-2012 988.19,10549.21 r270 bottom
R573 "ERJ-6ENF2671V" 0805-STANDART-2012 2120.08,11641.73 r0 bottom
R574 "ERJ-8GEYJ103V" 1206-STANDART-3216 2149.61,12242.13 r270 bottom
R575 "ERJ-8GEYJ103V" 1206-STANDART-3216 1362.2,11543.31 r90 bottom
R576 "ERJ-8GEYJ103V" 1206-STANDART-3216 427.17,12261.81 r270 bottom
R577 "ERJ-8GEYJ103V" 1206-STANDART-3216 673.23,10204.72 r180 bottom
R578 "ERJ-8GEYJ103V" 1206-STANDART-3216 673.23,10312.99 r180 bottom
R579 "ERJ-3EKF15R0V" 0603-STANDART-1608 2297.24,7625.98 r0 bottom
R580 "ERJ-3EKF15R0V" 0603-STANDART-1608 3163.39,7183.07 r180 top
R581 "ERJ-3EKF15R0V" 0603-STANDART-1608 3163.39,7320.87 r180 top
R582 "ERJ-3EKF15R0V" 0603-STANDART-1608 3163.39,7251.97 r180 top
R583 "ERJ-3EKF15R0V" 0603-STANDART-1608 3320.87,7517.72 r180 bottom
R584 "ERJ-3EKF15R0V" 0603-STANDART-1608 2297.24,7744.09 r0 bottom
R585 "ERJ-3EKF15R0V" 0603-STANDART-1608 1923.23,7251.97 r180 bottom
R586 "ERJ-3EKF15R0V" 0603-STANDART-1608 3803.15,8275.59 r270 bottom
R587 "ERJ-3EKF15R0V" 0603-STANDART-1608 4167.32,7970.47 r180 bottom
R588 "ERJ-3EKF15R0V" 0603-STANDART-1608 4167.32,8187.01 r180 bottom
R589 "ERJ-3EKF15R0V" 0603-STANDART-1608 4167.32,8324.8 r180 bottom
R590 "ERJ-8GEYJ331V" 1206-STANDART-3216 2513.78,6750 r90 top
R591 "ERJ-8GEYJ331V" 1206-STANDART-3216 1805.12,6759.84 r90 top
R592 "ERJ-8GEYJ331V" 1206-STANDART-3216 3931.1,6750 r90 top
R593 "ERJ-8GEYJ331V" 1206-STANDART-3216 3214.57,6750 r90 top
R594 "ERJ-8GEYJ1R0V" 1206-STANDART-3216 2129.92,7301.18 r270 bottom
R595 "ERJ-8GEYJ1R0V" 1206-STANDART-3216 2238.19,7301.18 r90 bottom
R596 "ERJ-8GEYJ1R0V" 1206-STANDART-3216 3503.62,7301.18 r90 bottom
R597 "ERJ-8GEYJ1R0V" 1206-STANDART-3216 3584.49,7257.72 r90 bottom
R598 "1-1879022-9" SMW-SMF-3W 1746.06,6021.65 r90 bottom
R599 "1-1879022-9" SMW-SMF-3W 2031.5,6021.65 r90 bottom
R600 "ERJ-8GEY0R00V" 1206-STANDART-3216 2533.46,7084.65 r270 top
R601 "ERJ-8GEY0R00V" 1206-STANDART-3216 1893.7,7025.59 r270 top
R602 "ERJ-8GEY0R00V" 1206-STANDART-3216 3970.47,7064.96 r270 top
R603 "ERJ-8GEY0R00V" 1206-STANDART-3216 3320.87,7015.75 r270 top
R604 "ERJ-8GEY0R00V" 1206-STANDART-3216 1391.73,2517.72 r180 top
R605 "ERJ-8GEY0R00V" 1206-STANDART-3216 4383.86,6887.8 r90 bottom
R606 "ERJ-8GEY0R00V" 1206-STANDART-3216 2553.15,4328.74 r90 bottom
R607 "ERJ-14YJ514U" 1210-STANDART-3225 2248.03,6218.5 r0 bottom
R608 "ERJ-14YJ514U" 1210-STANDART-3225 1509.84,6188.98 r0 bottom
R609 "ERJ-14YJ514U" 1210-STANDART-3225 3222.44,6149.61 r180 bottom
R610 "ERJ-14YJ514U" 1210-STANDART-3225 2877.95,5883.86 r270 bottom
R611 "ERJ-3EKF2700V" 0603-STANDART-1608 6293.31,11307.09 r270 top locked
R612 "ERJ-3EKF2700V" 0603-STANDART-1608 6194.88,11307.09 r270 top locked
R613 "ERJ-3EKF2700V" 0603-STANDART-1608 6096.46,11307.09 r270 top locked
R614 "ERJ-3EKF2700V" 0603-STANDART-1608 5998.03,11307.09 r270 top locked
R615 "ERJ-3EKF2700V" 0603-STANDART-1608 4974.41,11543.31 r270 top
R616 "ERJ-3EKF2700V" 0603-STANDART-1608 4866.14,11543.31 r270 top
R617 "ERJ-3EKF2700V" 0603-STANDART-1608 5240.16,11996.06 r180 bottom
R618 "ERJ-3EKF2700V" 0603-STANDART-1608 4757.87,12045.28 r270 bottom
R619 "ERJ-3EKF2700V" 0603-STANDART-1608 4816.93,12045.28 r270 bottom
R620 "ERJ-3EKF2700V" 0603-STANDART-1608 4698.82,12045.28 r270 bottom
R621 "ERJ-3EKF2700V" 0603-STANDART-1608 1460.63,8462.6 r270 bottom
R622 "ERJ-3EKF2700V" 0603-STANDART-1608 1578.74,8462.6 r270 bottom
R623 "ERJ-3EKF2700V" 0603-STANDART-1608 1903.54,8423.23 r0 top
R624 "ERJ-3EKF2700V" 0603-STANDART-1608 1903.54,8265.75 r0 top
R625 "ERJ-3EKF2700V" 0603-STANDART-1608 1903.54,8344.49 r0 top
R626 "ERJ-3EKF2700V" 0603-STANDART-1608 4472.44,7350.39 r180 bottom
R627 "ERJ-3EKF2700V" 0603-STANDART-1608 5122.05,7301.18 r270 bottom
R628 "ERJ-3EKF2700V" 0603-STANDART-1608 6509.84,8078.74 r0 bottom
R629 "ERJ-3EKF2700V" 0603-STANDART-1608 2385.83,10096.46 r90 top
R630 "ERJ-3EKF2700V" 0603-STANDART-1608 2966.54,8974.41 r0 bottom
R631 "ERJ-3EKF2700V" 0603-STANDART-1608 2533.46,8984.25 r180 bottom
R632 "CRCW2512100KJNEG" 2512-STANDART-6332 5988.19,5824.8 r270 top
R633 "CRCW2512100KJNEG" 2512-STANDART-6332 5988.19,5824.8 r90 bottom
R634 "CRCW2512100KJNEG" 2512-STANDART-6332 6381.89,6090.55 r0 bottom
R635 "CRCW2512100KJNEG" 2512-STANDART-6332 2238.19,2606.3 r0 bottom
R636 "CRCW2512100KJNEG" 2512-STANDART-6332 1883.86,2606.3 r0 bottom
R637 "CRCW2512100KJNEG" 2512-STANDART-6332 4698.82,5057.09 r270 bottom
R638 "CRCW2512100KJNEG" 2512-STANDART-6332 4935.04,5145.67 r180 bottom
R639 "CRCW2512100KJNEG" 2512-STANDART-6332 604.33,3147.64 r90 bottom
R640 "CRCW2512100KJNEG" 2512-STANDART-6332 417.32,2940.94 r90 bottom
R641 "CRM2512-FX-R100ELF" 2512-STANDART-6332 6618.11,6375.98 r90 top
R642 "CRM2512-FX-R100ELF" 2512-STANDART-6332 6618.11,6385.83 r90 bottom
R643 "MP9100-15.0-1%" TO-247AC-d1_8_R_UNIVER 3448.82,2931.1 r180 top locked
R644 "MP9100-15.0-1%" TO-247AC-d1_8_R_UNIVER 1972.44,2931.1 r180 top locked
R645 "MP9100-15.0-1%" TO-247AC-d1_8_R_UNIVER 2700.79,2931.1 r180 top locked
R646 "MP9100-100-1%" TO-247AC-d1_8_R_UNIVER 933.07,4151.57 r90 top locked
R647 "MP9100-100-1%" TO-247AC-d1_8_R_UNIVER 933.07,3433.07 r90 top locked
R648 "MP9100-100-1%" TO-247AC-d1_8_R_UNIVER 4527.56,3472.44 r270 top locked
R649 "MP9100-100-1%" TO-247AC-d1_8_R_UNIVER 4527.56,4220.47 r270 top locked
R650 "CRCW251222K0JNEG" 2512-STANDART-6332 6293.31,7242.13 r270 top
R651 "CRCW251222K0JNEG" 2512-STANDART-6332 6293.31,7242.13 r90 bottom
R652 "CRCW251222K0JNEG" 2512-STANDART-6332 6027.56,7242.13 r270 bottom
R653 "CRCW251222K0JNEG" 2512-STANDART-6332 6027.56,7242.13 r90 top
R654 "CRCW251222K0JNEG" 2512-STANDART-6332 5929.13,6848.43 r270 top
R655 "ERJ-14NF51R1U" 1210-STANDART-3225 6273.62,7724.41 r0 top
R656 "ERJ-3EKF3403V" 0603-STANDART-1608 1224.41,9584.65 r180 top
R657 "ERJ-3EKF3403V" 0603-STANDART-1608 4757.87,5952.76 r180 bottom
R658 "ERJ-3EKF3403V" 0603-STANDART-1608 6007.87,8000 r180 top
R659 "ERJ-3EKF3403V" 0603-STANDART-1608 4816.93,6395.67 r90 top
R660 "ERJ-3EKF3403V" 0603-STANDART-1608 2326.77,4929.13 r180 bottom
R661 "ERJ-3EKF3403V" 0603-STANDART-1608 4688.98,6592.52 r90 bottom
R662 "ERJ-3EKF2100V" 0603-STANDART-1608 6125.98,8147.64 r270 top
R663 "ERJ-3EKF2100V" 0603-STANDART-1608 4748.03,6592.52 r270 bottom
R664 "ERJ-3EKF6341V" 0603-STANDART-1608 1578.74,9358.27 r90 bottom
R665 "ERJ-3EKF6341V" 0603-STANDART-1608 5683.07,5362.2 r90 bottom
R666 "ERJ-3EKF6341V" 0603-STANDART-1608 5122.05,6297.24 r90 bottom
R667 "ERJ-3EKF6341V" 0603-STANDART-1608 3537.4,5253.94 r180 bottom
R668 "ERJ-3EKF4642V" 0603-STANDART-1608 1362.2,9938.98 r180 bottom
R669 "ERJ-3EKF4642V" 0603-STANDART-1608 5279.53,5854.33 r0 top
R670 "ERJ-3EKF4642V" 0603-STANDART-1608 5279.53,6986.22 r180 bottom
R671 "ERJ-3EKF4642V" 0603-STANDART-1608 2769.68,4948.82 r180 bottom
R672 "ERJ-3EKF5362V" 0603-STANDART-1608 5899.61,8324.8 r0 bottom
R673 "ERJ-6ENF1001V" 0805-STANDART-2012 2375.98,7143.7 r270 bottom
R674 "ERJ-6ENF1001V" 0805-STANDART-2012 3822.83,7173.23 r270 bottom
R675 "ERJ-6ENF1002V" 0805-STANDART-2012 318.9,10283.46 r180 bottom
R676 "ERJ-6ENF1002V" 0805-STANDART-2012 1066.93,4732.28 r270 bottom
R677 "ERJ-6ENF1002V" 0805-STANDART-2012 1608.27,3059.06 r270 bottom
R678 "ERJ-6ENF1002V" 0805-STANDART-2012 4423.23,5312.99 r90 bottom
R679 "ERJ-6ENF1002V" 0805-STANDART-2012 1165.35,5234.25 r180 bottom
R680 "ERJ-8RQJ4R7V" 1206-STANDART-3216 466.54,10224.41 r270 bottom
R681 "ERJ-8RQJ4R7V" 1206-STANDART-3216 988.19,4978.35 r180 bottom
R682 "ERJ-8RQJ4R7V" 1206-STANDART-3216 1440.94,3098.43 r180 bottom
R683 "ERJ-8RQJ4R7V" 1206-STANDART-3216 4423.23,5106.3 r180 bottom
R684 "ERJ-8RQJ4R7V" 1206-STANDART-3216 1244.09,4998.03 r180 bottom
R685 "ERJ-6ENF10R7V" 0805-STANDART-2012 1332.68,8984.25 r0 bottom
R686 "ERJ-6ENF10R7V" 0805-STANDART-2012 4954.72,5421.26 r180 bottom
R687 "ERJ-6ENF10R7V" 0805-STANDART-2012 1854.33,5312.99 r0 bottom
R688 "ERJ-6GEYJ751V" 0805-STANDART-2012 1775.59,4781.5 r270 bottom
R689 "ERJ-6GEYJ751V" 0805-STANDART-2012 2090.55,3423.23 r270 bottom
R690 "ERJ-6GEYJ751V" 0805-STANDART-2012 3931.1,4761.81 r0 bottom
R691 "ERJ-6GEYJ751V" 0805-STANDART-2012 1775.59,4948.82 r90 bottom
R692 "ERJ-6GEYJ751V" 0805-STANDART-2012 712.6,10253.94 r0 top
R693 "CRM2512-FX-R150ELF" 2512-STANDART-6332 663.39,7498.03 r0 bottom
R694 "CRM2512-FX-R150ELF" 2512-STANDART-6332 663.39,7330.71 r0 bottom
R695 "CRM2512-FX-R150ELF" 2512-STANDART-6332 663.39,6720.47 r0 bottom
R696 "CRM2512-FX-R150ELF" 2512-STANDART-6332 663.39,6887.8 r0 bottom
R697 "CRM2512-FX-R150ELF" 2512-STANDART-6332 663.39,6080.71 r0 bottom
R698 "CRM2512-FX-R150ELF" 2512-STANDART-6332 663.39,6248.03 r0 bottom
R699 "CRM2512-FX-R150ELF" 2512-STANDART-6332 663.39,5460.63 r0 bottom
R700 "CRM2512-FX-R150ELF" 2512-STANDART-6332 663.39,5627.95 r0 bottom
R701 "CRM2512-FX-R150ELF" 2512-STANDART-6332 663.39,4584.65 r0 bottom
R702 "CRM2512-FX-R150ELF" 2512-STANDART-6332 663.39,4751.97 r0 bottom
R703 "CRM2512-FX-R150ELF" 2512-STANDART-6332 663.39,3964.57 r0 bottom
R704 "CRM2512-FX-R150ELF" 2512-STANDART-6332 663.39,4141.73 r0 bottom
R705 "ERJ-14NF10R0U" 1210-STANDART-3225 545.28,9564.96 r180 bottom
R706 "ERJ-14NF10R0U" 1210-STANDART-3225 358.27,10263.78 r0 top
R707 "ERJ-3EKF2101V" 0603-STANDART-1608 4639.76,5942.91 r90 top
R708 "ERJ-6ENF2432V" 0805-STANDART-2012 732.28,10450.79 r270 bottom
R709 "ERJ-6ENF1471V" 0805-STANDART-2012 633.86,10450.79 r90 bottom
R710 "ERJ-3EKF1004V" 0603-STANDART-1608 5318.9,8620.08 r90 top
R711 "ERJ-3EKF1004V" 0603-STANDART-1608 4649.61,8708.66 r270 bottom
R712 "ERJ-3EKF1004V" 0603-STANDART-1608 4147.64,8629.92 r90 bottom
R713 "ERJ-3EKF1004V" 0603-STANDART-1608 4216.54,10244.09 r90 top
R714 "ERJ-3EKF1004V" 0603-STANDART-1608 4767.72,9801.18 r270 top
R715 "ERJ-3EKF3923V" 0603-STANDART-1608 5220.47,8570.87 r0 top
R716 "ERJ-3EKF3923V" 0603-STANDART-1608 4590.55,8816.93 r0 bottom
R717 "ERJ-3EKF3923V" 0603-STANDART-1608 4118.11,8511.81 r0 bottom
R718 "ERJ-3EKF1213V" 0603-STANDART-1608 5092.52,8590.55 r90 top
R719 "ERJ-3EKF1213V" 0603-STANDART-1608 4423.23,8797.24 r180 bottom
R720 "ERJ-3EKF1213V" 0603-STANDART-1608 4236.22,8403.54 r180 bottom
R721 "ERJ-6ENF7871V" 0805-STANDART-2012 2316.93,11513.78 r0 bottom
R722 "ERJ-3EKF2701V" 0603-STANDART-1608 3183.07,12124.02 r90 top
R723 "ERJ-3EKF2701V" 0603-STANDART-1608 2730.32,9988.19 r90 bottom
R724 "ERJ-3EKF5602V" 0603-STANDART-1608 3389.76,10844.49 r180 top
R725 "ERJ-3EKF5602V" 0603-STANDART-1608 3429.13,10529.53 r180 top
R726 "ERJ-3EKF1743V" 0603-STANDART-1608 3429.13,10598.43 r0 top
R727 "ERJ-3EKF1783V" 0603-STANDART-1608 3389.76,10903.54 r0 top
R728 "CRCW12101R30FKEA" 1210-STANDART-3225 1736.22,10263.78 r270 top
R729 "CRCW2512510RJNEG" 2512-STANDART-6332 1933.07,10332.68 r270 top
R730 "3306F-1-103" 3306-F-BOURNS 4580.71,10618.11 r270 top
R731 "ERJ-3EKF3012V" 0603-STANDART-1608 4639.76,10214.57 r270 bottom
R732 "ERJ-3EKF1003V" 0603-STANDART-1608 4826.77,10116.14 r180 bottom
R733 "ERJ-3EKF2493V" 0603-STANDART-1608 4659.45,10312.99 r180 top
R734 "ERJ-3EKF7502V" 0603-STANDART-1608 4501.97,10214.57 r90 bottom
R735 "ERJ-3EKF2803V" 0603-STANDART-1608 4344.49,10352.36 r180 top
R736 "ERJ-3EKF2803V" 0603-STANDART-1608 4866.14,9732.28 r180 top
R737 "ERJ-3EKF9763V" 0603-STANDART-1608 4452.76,9830.71 r270 top
R738 "ERJ-3EKF9763V" 0603-STANDART-1608 4127.95,9830.71 r270 top
R739 "ERJ-3EKF9763V" 0603-STANDART-1608 3744.09,9820.87 r270 top
R740 "ERJ-3EKF1823V" 0603-STANDART-1608 4501.97,9732.28 r180 top
R741 "ERJ-3EKF2373V" 0603-STANDART-1608 5023.62,9850.39 r270 top
R742 "ERJ-3EKF3740V" 0603-STANDART-1608 4767.72,9968.5 r270 top
R743 "ERJ-3EKF1182V" 0603-STANDART-1608 4354.33,9860.24 r270 top
R744 "ERJ-3EKF1501V" 0603-STANDART-1608 4452.76,9968.5 r270 top
R745 "ERJ-3EKF1023V" 0603-STANDART-1608 4157.48,9722.44 r180 top
R746 "ERJ-3EKF1023V" 0603-STANDART-1608 3803.15,9712.6 r180 top
R747 "ERJ-3EKF2370V" 0603-STANDART-1608 4137.8,9968.5 r270 top
R748 "ERJ-3EKF1403V" 0603-STANDART-1608 3990.16,9850.39 r270 top
R749 "ERJ-3EKF1183V" 0603-STANDART-1608 4679.13,9860.24 r270 top
R750 "ERJ-3EKF1430V" 0603-STANDART-1608 3744.09,9958.66 r270 top
R751 "ERJ-3EKF1053V" 0603-STANDART-1608 4767.72,9820.87 r90 bottom
R752 "ERJ-3EKF1053V" 0603-STANDART-1608 5043.31,9761.81 r90 bottom
R753 "ERJ-3EKF1053V" 0603-STANDART-1608 4305.12,10263.78 r90 bottom
R754 "ERJ-3EKF1053V" 0603-STANDART-1608 4393.7,9830.71 r90 bottom
S1 "7914G-1-000E" 7914G 6578.74,10726.38 r270 top
S2 "7914G-1-000E" 7914G 6578.74,11031.5 r270 top
TP1 "5006" TEST-POINTS-1 1411.42,6956.69 r0 bottom
TP2 "5006" TEST-POINTS-1 2877.95,6690.94 r0 bottom
TP3 "5006" TEST-POINTS-1 1559.06,6956.69 r0 top
TP4 "5006" TEST-POINTS-1 2877.95,6818.9 r0 top
TP5 "5006" TEST-POINTS-1 919.29,8226.38 r0 bottom
TP6 "5006" TEST-POINTS-1 3557.09,12320.87 r0 top
TP7 "5006" TEST-POINTS-1 3143.7,9515.75 r0 top
TP8 "5125" TEST-POINTS-1 3812.99,5775.59 r0 bottom
TP9 "5125" TEST-POINTS-1 1135.83,5559.06 r0 bottom
TP10 "5125" TEST-POINTS-1 456.69,9279.53 r0 bottom
TP11 "5125" TEST-POINTS-1 6618.11,6139.76 r0 top
TP12 "5125" TEST-POINTS-1 437.01,7606.3 r0 top
TP13 "5125" TEST-POINTS-1 663.39,7035.43 r0 top
TP14 "5125" TEST-POINTS-1 663.39,6395.67 r0 top
TP15 "5125" TEST-POINTS-1 663.39,5775.59 r0 top
TP16 "5125" TEST-POINTS-1 663.39,4919.29 r0 top
TP17 "5125" TEST-POINTS-1 683.07,4289.37 r180 top
TP18 "5010" TEST-POINTS-1 3055.12,11553.15 r0 top
TP19 "5010" TEST-POINTS-1 4147.64,11307.09 r0 top
TP20 "5010" TEST-POINTS-1 2218.5,10253.94 r0 top
TP21 "5010" TEST-POINTS-1 545.28,11494.09 r0 top
TP22 "5010" TEST-POINTS-1 1992.13,10687.01 r0 top
TP23 "5010" TEST-POINTS-1 2257.87,10687.01 r0 top
TP24 "5010" TEST-POINTS-1 3074.8,10431.1 r0 top
TP25 "5011" TEST-POINTS-1 545.28,11681.1 r0 top
TP26 "5011" TEST-POINTS-1 6608.27,7104.33 r0 top
TP27 "5005" TEST-POINTS-1 3793.31,6700.79 r0 bottom
TP28 "5005" TEST-POINTS-1 2366.14,6690.94 r0 bottom
TP29 "5013" TEST-POINTS-1 5850.39,6622.05 r0 top
TP30 "5013" TEST-POINTS-1 4826.77,4181.1 r0 top
TP31 "5013" TEST-POINTS-1 742.13,5913.39 r0 top
TP32 "5013" TEST-POINTS-1 732.28,5106.3 r0 top
TP33 "5008" TEST-POINTS-1 2523.62,7311.02 r0 top
TP34 "5008" TEST-POINTS-1 3950.79,7320.87 r0 top
TP35 "5014" TEST-POINTS-1 6549.21,12035.43 r0 top
TP36 "5014" TEST-POINTS-1 3566.93,12114.17 r0 top
TP37 "5014" TEST-POINTS-1 3478.35,7625.98 r0 bottom
TP38 "5014" TEST-POINTS-1 1647.64,6700.79 r0 bottom
TP39 "5014" TEST-POINTS-1 5791.34,7488.19 r0 top
TP40 "5014" TEST-POINTS-1 3232.28,9751.97 r0 top
TP41 "5014" TEST-POINTS-1 5486.22,7852.36 r0 top
TP42 "5014" TEST-POINTS-1 2326.77,9299.21 r0 top
TP43 "5122" TEST-POINTS-1 3084.65,6690.94 r0 bottom
TP44 "5126" TEST-POINTS-1 2366.14,4250 r0 bottom
TP45 "5126" TEST-POINTS-1 5811.02,10381.89 r0 top
TP46 "5126" TEST-POINTS-1 2139.76,8147.64 r0 bottom
TP47 "5126" TEST-POINTS-1 1903.54,8147.64 r0 top
TP48 "5126" TEST-POINTS-1 4551.18,9072.83 r0 top
TP49 "5126" TEST-POINTS-1 1992.13,5175.2 r0 bottom
TP50 "5126" TEST-POINTS-1 5653.54,5125.98 r0 top
TP51 "5126" TEST-POINTS-1 5663.39,7064.96 r0 top
TP52 "5126" TEST-POINTS-1 4216.54,7812.99 r0 top
TP53 "5126" TEST-POINTS-1 5811.02,10234.25 r0 bottom
TP54 "5126" TEST-POINTS-1 3350.39,9978.35 r0 bottom
TP55 "5126" TEST-POINTS-1 3212.6,9978.35 r0 top
TP56 "5126" TEST-POINTS-1 4738.19,9072.83 r0 bottom
TP57 "5126" TEST-POINTS-1 5328.74,7852.36 r0 bottom
TP58 "5126" TEST-POINTS-1 5663.39,6887.8 r0 bottom
V1 "IRGP30B120KD-EP" TO-247AC-d1_8 2366.14,6509.84 r180 top locked
V2 "IRGP30B120KD-EP" TO-247AC-d1_8 1637.8,6509.84 r180 top locked
V3 "IRGP30B120KD-EP" TO-247AC-d1_8 3822.83,6509.84 r180 top locked
V4 "IRGP30B120KD-EP" TO-247AC-d1_8 3094.49,6509.84 r180 top locked
V5 "1N4148W-7-F" SOD123-DIODES 1253.94,9417.32 r90 bottom
V6 "1N4148W-7-F" SOD123-DIODES 1165.35,9427.17 r270 bottom
V7 "1N4148W-7-F" SOD123-DIODES 1588.58,9879.92 r180 bottom
V8 "1N4148W-7-F" SOD123-DIODES 5535.43,5322.83 r90 top
V9 "1N4148W-7-F" SOD123-DIODES 5446.85,5322.83 r270 top
V10 "1N4148W-7-F" SOD123-DIODES 5112.2,5903.54 r0 top
V11 "1N4148W-7-F" SOD123-DIODES 3606.3,11080.71 r0 top
V12 "1N4148W-7-F" SOD123-DIODES 2307.09,11405.51 r180 bottom
V13 "1N4148W-7-F" SOD123-DIODES 2818.9,10135.83 r0 top
V14 "1N4148W-7-F" SOD123-DIODES 5732.28,8364.17 r0 bottom
V15 "1N4148W-7-F" SOD123-DIODES 5112.2,6533.46 r0 bottom
V16 "1N4148W-7-F" SOD123-DIODES 5112.2,6444.88 r180 bottom
V17 "1N4148W-7-F" SOD123-DIODES 5437.01,6986.22 r180 bottom
V18 "1N4148W-7-F" SOD123-DIODES 6431.1,6464.57 r90 bottom
V19 "1N4148W-7-F" SOD123-DIODES 3183.07,5411.42 r180 bottom
V20 "1N4148W-7-F" SOD123-DIODES 3183.07,5500 r0 bottom
V21 "1N4148W-7-F" SOD123-DIODES 2887.8,4899.61 r90 bottom
V22 "UDZSTE-175.1B" SOD323F_SC90 1923.23,12143.7 r270 bottom
V23 "UDZSTE-175.1B" SOD323F_SC90 1352.36,11375.98 r270 bottom
V24 "UDZSTE-175.1B" SOD323F_SC90 2681.1,11474.41 r270 bottom
V25 "STPS3L60U" SMB-ST 2799.21,12143.7 r180 bottom
V26 "STPS3L60U" SMB-ST 4000,11444.88 r270 top
V27 "STPS3L60U" SMB-ST 5230.31,11818.9 r90 bottom
V28 "STPS3L60U" SMB-ST 112.2,11248.03 r90 bottom
V29 "PTVS45VP1UP,115" RTVSxP1UP 318.9,11248.03 r90 bottom
V30 "PTVS3V3P1UP,115" RTVSxP1UP 5279.53,11543.31 r0 bottom
V31 "PTVS3V3P1UP,115" RTVSxP1UP 2011.81,10372.05 r270 bottom
V32 "MURS160-13-F" SMB-MURS140-MURS160-DIODES 2385.83,6917.32 r90 bottom
V33 "MURS160-13-F" SMB-MURS140-MURS160-DIODES 2179.13,6787.4 r90 top
V34 "MURS160-13-F" SMB-MURS140-MURS160-DIODES 2336.61,7458.66 r180 bottom
V35 "MURS160-13-F" SMB-MURS140-MURS160-DIODES 1696.85,7153.54 r90 bottom
V36 "MURS160-13-F" SMB-MURS140-MURS160-DIODES 3822.83,6937.01 r90 bottom
V37 "MURS160-13-F" SMB-MURS140-MURS160-DIODES 3586.61,6799.21 r90 top
V38 "MURS160-13-F" SMB-MURS140-MURS160-DIODES 3763.78,7433.07 r180 bottom
V39 "MURS160-13-F" SMB-MURS140-MURS160-DIODES 3153.54,7104.33 r90 bottom
V40 "MURS160-13-F" SMB-MURS140-MURS160-DIODES 1224.41,10470.47 r180 top
V41 "PTVS16VP1UP,115" RTVSxP1UP 1214.57,10312.99 r0 top
V42 "P6SMB400CA" SMB-DIODES_1 1500,6336.61 r180 bottom
V43 "P6SMB400CA" SMB-DIODES_1 3251.97,6001.97 r0 bottom
V44 "P6SMB400CA" SMB-DIODES_1 3694.88,6120.08 r0 bottom
V45 "KDZTR12B" SOD-123FL 1696.85,6887.8 r270 bottom
V46 "KDZTR12B" SOD-123FL 3084.65,6858.27 r270 bottom
V47 "KDZTR12B" SOD-123FL 328.74,10194.88 r0 bottom
V48 "KDZTR12B" SOD-123FL 1165.35,4742.13 r90 bottom
V49 "KDZTR12B" SOD-123FL 1706.69,3068.9 r90 bottom
V50 "KDZTR12B" SOD-123FL 4344.49,5293.31 r270 bottom
V51 "KDZTR12B" SOD-123FL 1165.35,5145.67 r0 bottom
V52 "KDZTR20B" SOD-123FL 2553.15,6681.1 r90 bottom
V53 "KDZTR20B" SOD-123FL 1834.65,6681.1 r90 bottom
V54 "KDZTR20B" SOD-123FL 4000,6661.42 r90 bottom
V55 "KDZTR20B" SOD-123FL 3271.65,6671.26 r90 bottom
V56 "VS-E4TU2006TFP-N3" TO-220-2_C1_A2_DIODE 4531.5,4850.39 r90 top locked
V57 "IXTH20P50P" TO-247AC-d1_8 948.82,5421.26 r270 top
V58 "IXTP96P085T" TO-220AB_V_IR 929.13,4756.69 r270 top locked
V59 "SMBJP6KE440A-TP" SMB-MURS140-MURS160-DIODES 1500,2685.04 r270 bottom
V60 "SMBJP6KE440A-TP" SMB-MURS140-MURS160-DIODES 2001.97,3984.25 r90 bottom
V61 "SMBJP6KE440A-TP" SMB-MURS140-MURS160-DIODES 1992.13,4535.43 r90 bottom
V62 "IXTP10P50P" TO-220AB_V_IR 1332.68,2931.1 r0 top locked
V63 "IXTP10P50P" TO-220AB_V_IR 4531.5,5346.85 r90 top locked
V64 "SI4497DY-T1-GE3" SOIC-8-AD-R8 594.49,9929.13 r0 bottom
V65 "PMEG4005EGWX" SOD123-DIODES 6293.31,8748.03 r270 top
V66 "PMEG4005EGWX" SOD123-DIODES 5870.08,9053.15 r0 top
V67 "PMEG4005EGWX" SOD123-DIODES 5840.55,8767.72 r270 top
V68 "PMEG4005EGWX" SOD123-DIODES 6283.46,8944.88 r270 top
V69 "PMEG4005EGWX" SOD123-DIODES 6047.24,9141.73 r180 top
V70 "PMEG4005EGWX" SOD123-DIODES 5683.07,8885.83 r0 top
V71 "PMEG4005EGWX" SOD123-DIODES 5692.91,9112.2 r0 top
V72 "PMEG4005EGWX" SOD123-DIODES 5683.07,8974.41 r0 top
V73 "PMEG4005EGWX" SOD123-DIODES 5692.91,9210.63 r0 top
V74 "PMEG4005EGWX" SOD123-DIODES 5692.91,9309.06 r0 top
X1 "3-1437664-0" 3-1437664-0 348.43,8324.8 r270 top locked
X2 "M80-5101442" M80-VERT-J-TEK-14 4521.65,11750 r180 top
X3 "M80-5101242" M80-VERT-J-TEK-12 5889.76,11828.74 r0 top
X4 "M80-5101242" M80-VERT-J-TEK-12 5889.76,11523.62 r0 top
X5 "0039281063" 2Rx6K 6401.57,6789.37 r0 top locked
X6 "0039281063" 2Rx6K 6411.42,5805.12 r0 top locked
X7 "0039281103" 2Rx10K 614.17,8954.72 r180 top locked
X8 "8730" TERMINAL-1 3635.83,2537.4 r0 top
X9 "3-1437646-3" 14_h12_7_2K-PICH6_35 427.17,7222.44 r270 top locked
X10 "3-1437646-3" 14_h12_7_2K-PICH6_35 427.17,6612.2 r270 top locked
X11 "3-1437646-3" 14_h12_7_2K-PICH6_35 427.17,6001.97 r270 top locked
X12 "3-1437646-3" 14_h12_7_2K-PICH6_35 427.17,5391.73 r270 top locked
X13 "3-1437646-3" 14_h12_7_2K-PICH6_35 427.17,4496.06 r270 top locked
X14 "3-1437646-3" 14_h12_7_2K-PICH6_35 427.17,3846.46 r270 top locked
X15 "0039281043" 2Rx4K 6490.16,5312.99 r270 top locked
X16 "0039281043" 2Rx4K 6490.16,4574.8 r270 top locked
X17 "SBH11-PBPC-D10-ST-BK" IDS-20-V-2,54 6150,12273.23 r180 top locked
X18 "SBH11-PBPC-D10-ST-BK" IDS-20-V-2,54 3862.2,12173.23 r0 top
X19 "SBH11-PBPC-D10-ST-BK" IDS-20-V-2,54 2503.94,7852.36 r0 top locked
X20 "SBH11-PBPC-D10-ST-BK" IDS-20-V-2,54 4570.87,7448.82 r0 top locked
X21 "SBH11-PBPC-D10-ST-BK" IDS-20-V-2,54 1923.23,9751.97 r0 top locked
X22 "SBH11-PBPC-D10-ST-BK" IDS-20-V-2,54 4374.02,8078.74 r0 top locked
X23 "SBH11-PBPC-D10-ST-BK" IDS-20-V-2,54 2797.24,8397.24 r90 top
X24 "0436500215" 1Rx2K_VERT_Micro 240.16,10086.61 r0 top locked
X25 "0436500215" 1Rx2K_VERT_Micro 240.16,9830.71 r0 top locked
X26 "0436500215" 1Rx2K_VERT_Micro 240.16,9574.8 r0 top locked
X27 "0039281083" 2Rx8K 220.47,11700.79 r90 top locked